# Altium PCB DB42.PcbDoc (part 8 of 8)
Units mil, origin at the board's own origin, x right, y up, seen from the top; angles counter-clockwise.
Board outline 3236.22 x 4456.69 mil, 8 copper layers (Top Layer, MidLayer1, MidLayer2, GND-Layer5, MidLayer3, VCC, MidLayer4, Bottom Layer), stack 62.194 mil thick; 214 components, 470 nets, 1802 pads, 1663 vias.
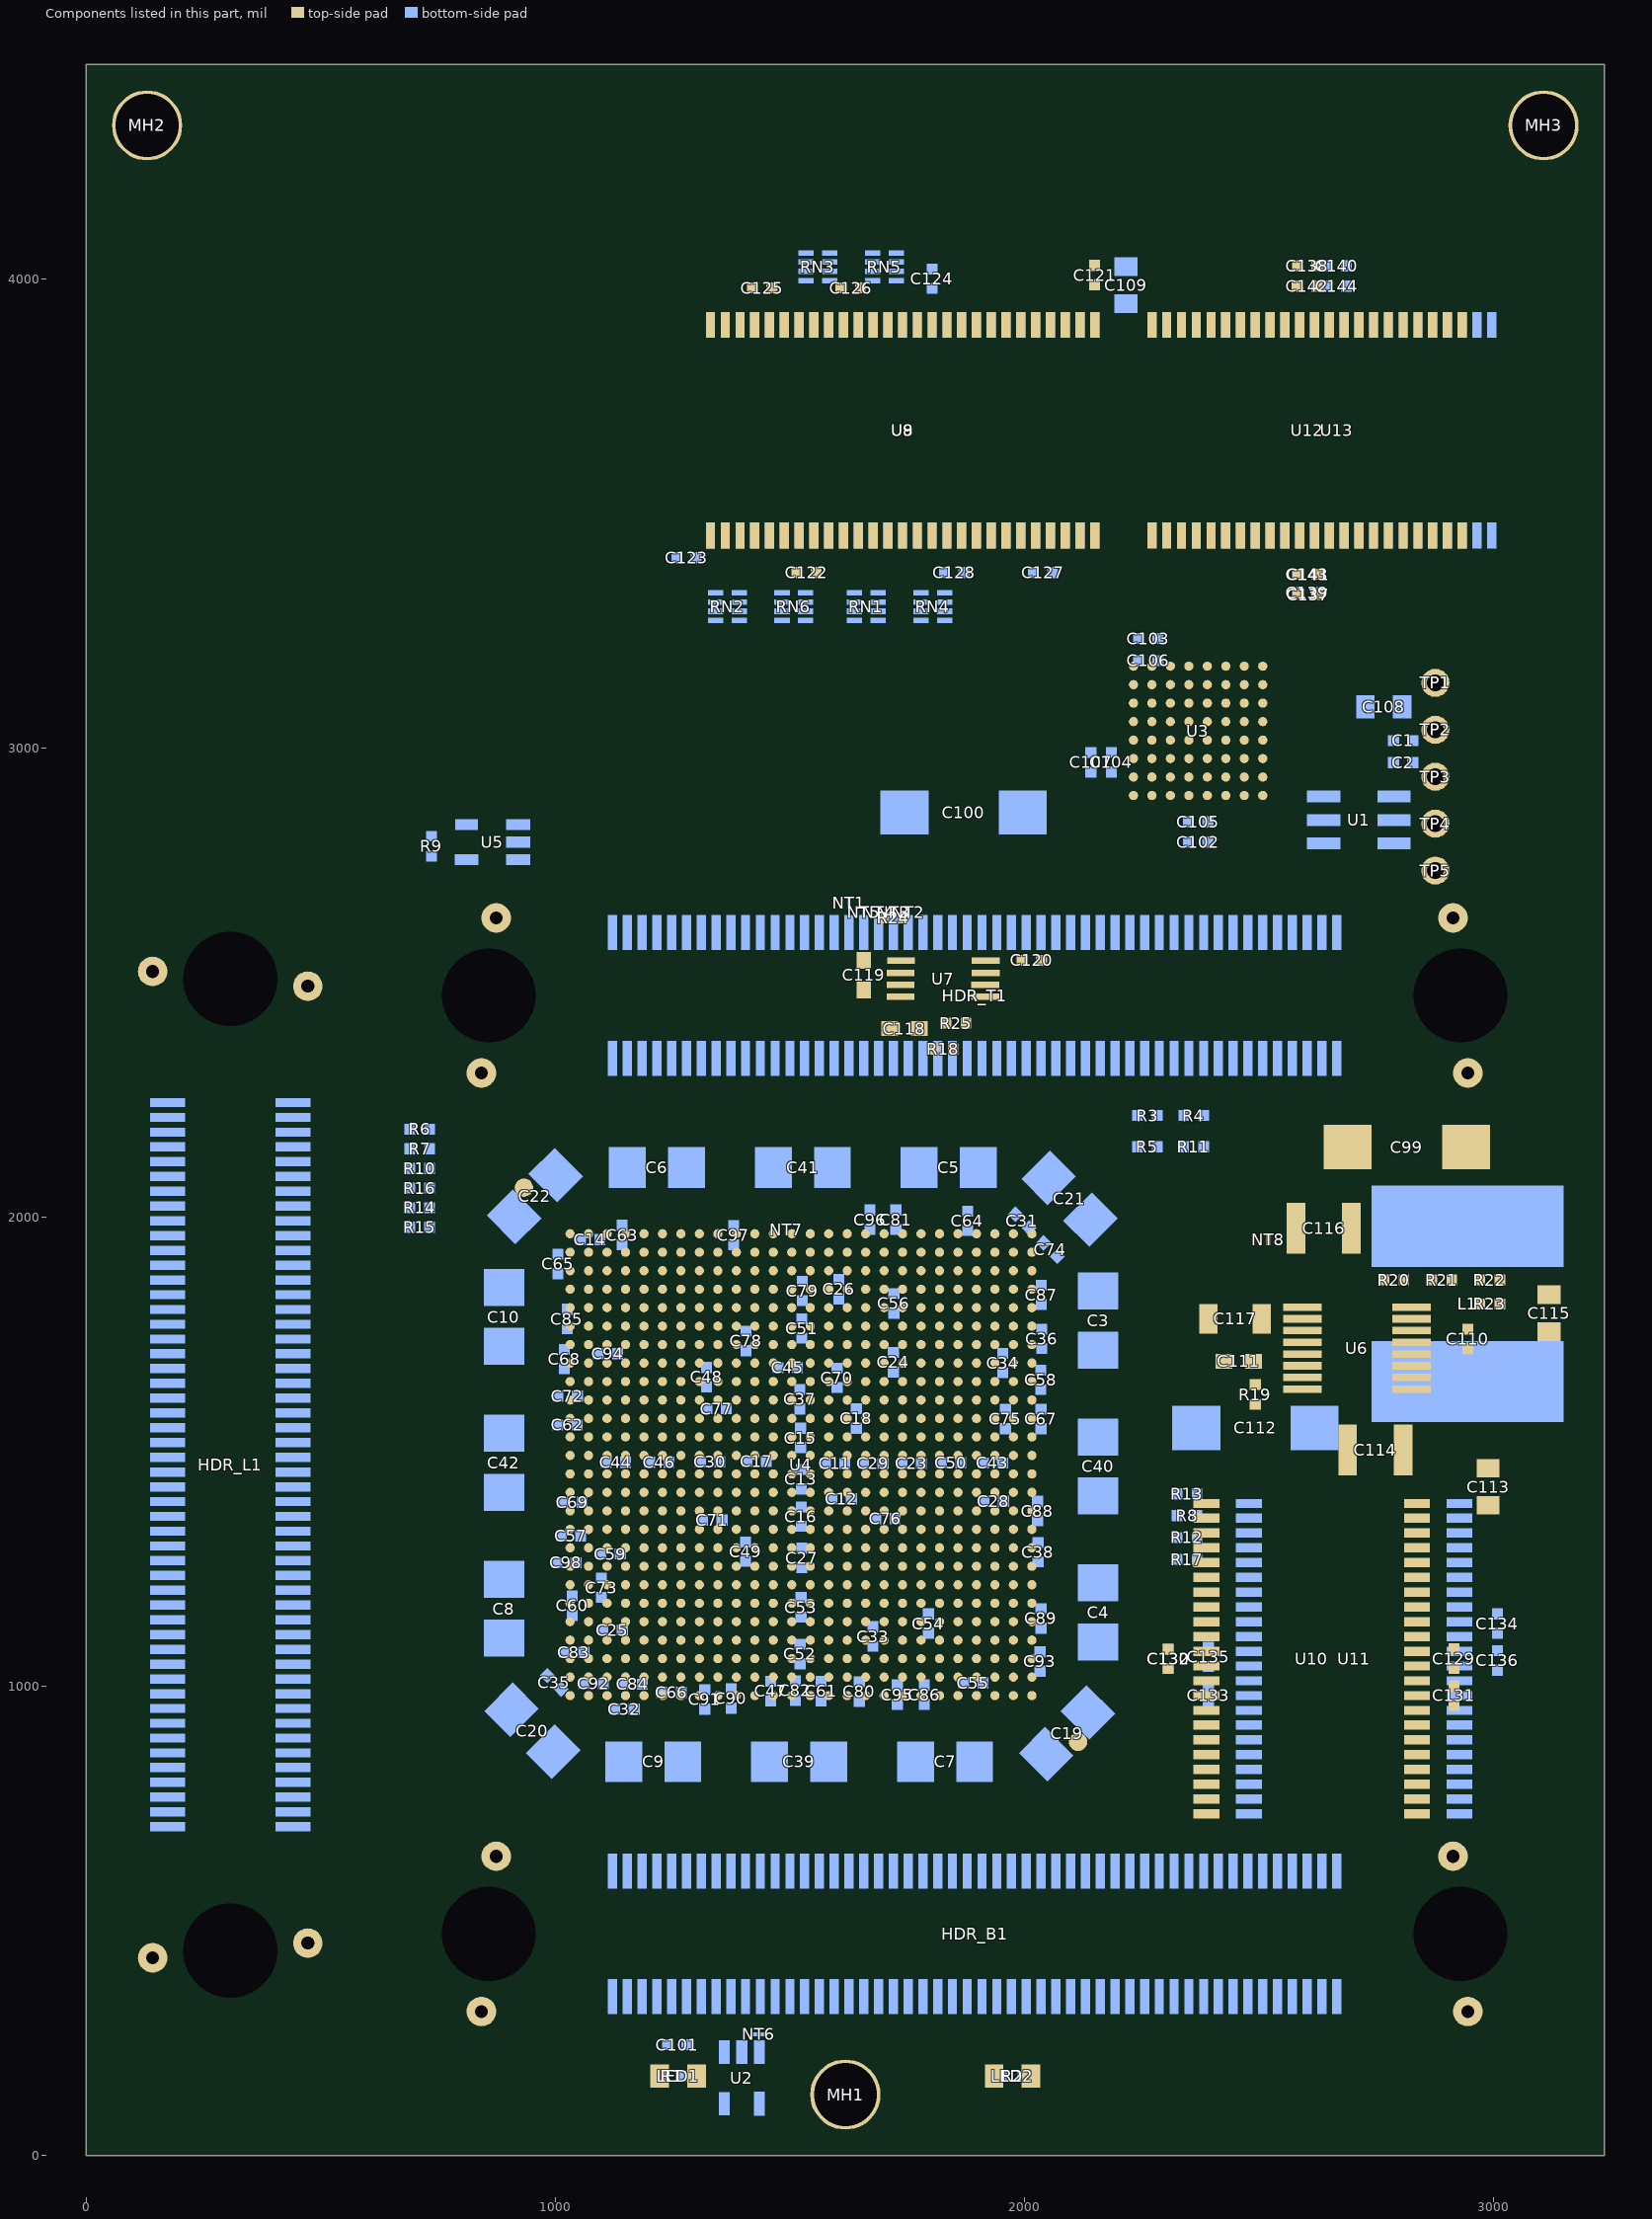
[diagram p14: the components of this part, seen from the top]

## Other copper (continued)
Bottom Layer:
  rectangle net 1V2: 2641.13,1901.74 2787.4,2043.82
  rectangle net LX: 2637.8,1618.11 2799.21,1728.35
  rectangle net 5V0: 2629.92,2248.03 2740.16,2346.46
  rectangle net 5V0: 2645.67,2248.03 2740.16,2346.46
  rectangle net 3V3: 2562.99,2570.86 2610.24,2704.72
  rectangle net 3V3: 2562.99,570.86 2610.24,704.72
  rectangle net GND: 2645.67,2598.43 2740.16,2696.85
  rectangle net 5V0: 2645.67,251.97 2740.16,346.46
  rectangle net GND: 2645.67,598.43 2740.16,696.85
GND-Layer5 (plane layer: these items are gaps in the copper):
  rectangle: 2645.67,2251.97 2740.16,2283.46
  rectangle: 2708.66,2283.47 2740.16,2346.46
  rectangle: 2570.87,2661.42 2602.36,2724.41
  rectangle: 2661.42,1641.73 2720.47,1696.85
  rectangle: 2645.67,251.97 2708.66,283.46
  rectangle: 2708.66,314.96 2740.16,346.46
  rectangle: 2570.87,661.42 2602.36,724.41
  text "GND" at 1645.67,437.01 h60
VCC (plane layer: these items are gaps in the copper):
  rectangle: 3102.36,4334.65 3228.35,4444.88
  rectangle: 23.62,4330.71 129.92,4440.94
  lines w19.68: 2624.02,0 2624.02,356.3 2787.4,519.68 2787.4,637.8 2838.58,688.98 2952.76,688.98 3055.12,791.34 3055.12,1244.09 3055.12,1287.4 3055.12,1389.76 3009.88,1435 2740,1435 2735,1440 2735,1587.6 2716.3,1606.3 2614.17,1606.3 2582.68,1574.8 2452.76,1574.8 2437.01,1590.55 2437.01,2015.75 2624.02,2202.76 2624.02,2383.86 2629.92,2389.76 2795.28,2389.76 2917.32,2267.72 3068.72,2267.72 3116,2315 3116,3975 3046,4045 2728,4045 2711.76,4061.24 2711.76,4456.69
  lines w30: 25.58,627.79 25.58,36.41 36.41,25.58 3205.87,25.58 3210.79,30.5 3210.79,4423.08 3201.94,4431.94 3124.2,4431.94 3123.22,4432.92 38.38,4432.92 27.55,4422.1 27.55,628.78
  text "5V0" at 2791.34,1826.77 h60
  text "3V3" at 1657.48,437.01 h60

## Silkscreen, mask and mechanical layers (free items; w line width, h text height)
Top Overlay:
  rectangle: 998.77,581.74 1627.79,617.74
  rectangle: 998.77,318.48 1627.79,354.48
  rectangle: 2710.5,318.48 2788.79,617.48
  region: 1073.79,617.74 998.77,617.74 998.77,318.48 1073.79,318.48
  region: 1689.96,4181.1 1689.96,4456.69 1670.28,4456.69 1670.28,4181.1
  region: 1598.43,4181.1 1598.43,4456.69 1593.51,4456.69 1593.51,4181.1
  region: 1618.11,4181.1 1618.11,4456.69 1610.24,4456.69 1610.24,4181.1
  region: 1640.75,4181.1 1640.75,4456.69 1628.94,4456.69 1628.94,4181.1
  region: 1664.37,4181.1 1664.37,4456.69 1649.61,4456.69 1649.61,4181.1
  region: 1579.72,4181.1 1579.72,4456.69 1576.77,4456.69 1576.77,4181.1
  rectangle: 1301.18,3503.94 2179.13,3596.46
  rectangle: 2238.19,3502.95 2966.89,3595.47
  region: 2787.4,695.23 2787.4,1424.21 2694.88,1424.21 2694.88,695.23
  rectangle: 1775.59,2456.69 1803,2559.05
  rectangle: 1337.26,129.92 1351.38,208.66
  rectangle: 2049.67,129.92 2063.98,208.66
  rectangle: 2736.22,1620.75 2768.58,1820.75
  region: 1840.85,253.71 1833.78,260.78 1756,183 1763.07,175.93
  rectangle: 1756,183 1766,218
  region: 1772.38,166.61 1779.46,159.54 1857.24,237.33 1850.17,244.4
  region: 1814.46,159.54 1814.46,169.54 1779.46,169.54 1779.46,159.54
  region: 3099.71,4136.09 3089.71,4136.09 3089.71,4026.09 3099.71,4026.09
  region: 3064.97,4111.34 3072.04,4104.27 3096.79,4129.02 3089.71,4136.09
  rectangle: 3112.89,4026.09 3122.89,4136.09
  region: 3122.89,4136.09 3115.82,4129.02 3140.56,4104.27 3147.64,4111.34
  region: 123.34,4136.09 113.34,4136.09 113.34,4026.09 123.34,4026.09
  region: 88.59,4111.34 95.66,4104.27 120.41,4129.02 113.34,4136.09
  rectangle: 136.51,4026.09 146.51,4136.09
  region: 146.51,4136.09 139.44,4129.02 164.19,4104.27 171.26,4111.34
  lines w3: 1118.09,192.91 1133.09,202.91 1123.09,202.91 1143.09,217.91 ; 1133.09,207.91 1143.09,217.91 ; 1133.09,212.91 1143.09,217.91 ; 2137.52,187.01 2152.52,197.01 2142.52,197.01 2162.52,212.01 ; 2152.52,202.01 2162.52,212.01 ; 2152.52,207.01 2162.52,212.01
  lines w5: 971.79,2024.27 992.13,2003.94 ; 1078.13,171.78 1103.06,171.78 ; 1103.06,173.36 1126.68,173.36 ; 1104.64,163.12 1126.68,172.05 ; 1104.64,180.97 1126.68,172.05 ; 1105.03,168.63 1126.68,172.96 ; 1105.03,175.46 1126.68,171.13 ; 1126.68,156.3 1126.68,187.79 ; 1126.68,171.78 1150.04,171.78 ; 1329.1,3386.03 1329.1,3414.79 ; 1687.62,2591.03 1707.96,2570.7 ; 2097.56,165.88 2122.48,165.88 ; 2122.48,167.45 2146.1,167.45 ; 2124.06,157.21 2146.1,166.14 ; 2124.06,175.07 2146.1,166.14 ; 2124.45,162.73 2146.1,167.06 ; 2124.45,169.56 2146.1,165.23 ; 2146.1,150.39 2146.1,181.89 ; 2146.1,165.88 2169.46,165.88 ; 2271.78,3384.98 2271.78,3413.74 ; 2646.32,3273.29 2625.98,3252.95 ; 2907.18,728.42 2878.41,728.42 ; 2908.93,1634.16 2880.16,1634.16 ; 3031.5,1822.83 3073.01,1882.13 ; 992.13,2003.94 964.13,2016.94 971.68,2024.38 979.13,2031.94 992.13,2003.94 ; 1126.68,172.05 1103.06,187.79 1103.06,156.3 1126.68,172.05 ; 1329.1,3414.79 1318.5,3385.8 1329.1,3385.88 1339.71,3385.8 1329.1,3414.79 ; 1707.96,2570.7 1694.96,2598.69 1687.52,2591.14 1679.96,2583.69 1707.96,2570.7 ; 2146.1,166.14 2122.48,150.39 2122.48,181.89 2146.1,166.14 ; 2271.78,3413.74 2282.39,3384.75 2271.78,3384.83 2261.17,3384.75 2271.78,3413.74 ; 2625.98,3252.95 2638.98,3280.95 2646.43,3273.4 2653.98,3265.95 2625.98,3252.95 ; 2878.41,728.42 2907.4,717.82 2907.33,728.42 2907.4,739.03 2878.41,728.42 ; 2880.16,1634.16 2909.15,1623.56 2909.08,1634.16 2909.15,1644.77 2880.16,1634.16
  lines w7: 971.13,2018.93 978.13,2011.94 ; 977.13,2024.94 984.13,2017.94 ; 1324.86,3389.33 1324.86,3399.23 ; 1333.35,3389.33 1333.35,3399.23 ; 1686.96,2585.69 1693.96,2578.69 ; 1692.96,2591.69 1699.96,2584.69 ; 2267.54,3388.29 2267.54,3398.18 ; 2276.02,3388.29 2276.02,3398.18 ; 2633.98,3266.95 2640.98,3273.95 ; 2639.98,3260.95 2646.98,3267.95 ; 2893.97,724.18 2903.87,724.18 ; 2893.97,732.67 2903.87,732.67 ; 2895.72,1629.92 2905.62,1629.92 ; 2895.72,1638.41 2905.62,1638.41
  lines w7.87: 1301.18,3722.33 ccw(c1301.18,3752.07) 1301.18,3781.82 ; 2179.13,3722.33 cw(c2179.13,3752.07) 2179.13,3781.82 ; 1708.66,4185.04 1708.66,4452.76 2972.66,4452.76 2972.66,4185.04 1708.66,4185.04
  text "Xilinx®  Spartan™3A-DSP" at 1708.66,4311.02 h98.43
  text "XC3SD1800A-4FGG676C" at 1708.66,4185.04 h98.43
  text "SRAM-256Kx16" at 2352.07,3683.79 h50
  text "DRAM-16Mx16" at 1482.53,3682.61 h50
  text "FLASH" at 2491.1,2767.2 h34
  text "MAX" at 1831.9,2475.9 h22 r90
  text "8860" at 1865.1,2465.2 h25 r90
  text "1831" at 2721.4,1671.7 h40 r90
  text "SRAM-256Kx16" at 2605.68,808.76 h50 r90
  text "DB42.02" at 1027.8,488.46 h98.42
  text "XC3SD1800A-4FGG676C" at 1027.8,430.47 h60
  text "Xilinx Daughter Board" at 1028.31,354.49 h60
  text "DB42.02" at 1625.79,318.46 h60
  text "PROGRAM" at 1145,60 h55.12
  text "POWER" at 1895,60 h55.12
Bottom Overlay:
  drawing of 1137 lines, arcs and shapes, not listed
  text "Xilinx®  Spartan™3A-DSP" at 2968.73,4318.9 h98.43
  text "XC3SD1800A-4FGG676C" at 2968.73,4185.04 h98.43
  text "MANUFACTURE" at 1006.78,3830.86 h40
  text "DATE" at 1007.88,3764.06 h40
  text "SRAM-256Kx16" at 2939.9,3684 h50
  text "DRAM-16Mx16" at 1997.78,3682.61 h50
  text ".Application_BuildNumber" at 627.63,3398.29 h60
  text "BUILD No:" at 901.4,3398.07 h34
  text "SVN 9250" at 627.63,3338.95 h60
  text "REVISION No:" at 976.18,3338.74 h34
  text "PCB MANUFACTURER:" at 1185.04,3279.53 h34
  text "COMPLIANCE:" at 1182.36,3081.45 h45
  text "CLASS 2" at 432.36,2991.45 h40
  text "IPC-A-600H" at 1092.36,2991.45 h40
  text "CLASS 2" at 432.36,2911.45 h40
  text "TYPE 3" at 682.36,2911.45 h40
  text "IPC-6012D" at 1092.36,2911.45 h40
  text "DS2406" at 2711.2,2774.8 h28 r270
  text "1" at 116.93,2272.44 h39.37
  text "1" at 1085.43,2256.69 h39.37
  text "SRAM-256Kx16" at 2709.68,784.5 h50 r270
  text "1" at 1073.62,264.57 h39.37
  text "DB42" at 412.16,123.67 h120
Bottom Paste:
  rectangle: 2313.39,1935.83 2443.7,2027.16
PCB Boundary:
  lines w3.94: 1523.62,4456.69 3236.22,4456.69 ; 1523.62,4456.69 3236.22,4456.69 ; 1523.62,4456.69 0,4456.69 0,0 1618.11,0 3236.22,0 3236.22,4456.69 ; 1523.62,4456.69 3236.22,4456.69 ; 1523.62,4456.69 3236.22,4456.69
Mechanical 7:
  lines w7.87: 2448.19,1719.13 2271.61,1846.46 2271.61,2043.31 2448.19,2170.63 ; 2511.22,1754.56 2334.65,1881.89 2334.65,2078.74 2511.22,2206.07 ; 2602.32,1944.88 2681.06,1944.88 ; 2641.69,1905.51 2641.69,1984.25 ; 2661.42,1980.32 2740.16,1980.32 ; 2700.79,1940.94 2700.79,2019.69 ; 2831.26,1719.13 3007.83,1846.46 3007.83,2043.31 2831.26,2170.63 ; 2894.29,1754.56 3070.87,1881.89 3070.87,2078.74 2894.29,2206.07
Keep Away From Edge:
  lines w7.87: 200,200 3030,200 3030,4250 200,4250 200,200

## Dimensions
307.09,437.01 to 858.27,472.44 on Dimensions
2929.13,472.44 to 2929.13,2472.44 on Dimensions
3106.3,4326.77 to 3236.22,0 on Dimensions
129.92,4342.52 to 0,15.75 on Dimensions
307.09,-15.75 to 0,4275.59 on Dimensions
3236.22,0 to 0,4059.06 on Dimensions
0,4456.69 to -19.69,0 on Dimensions
2929.14,472.44 to 3236.22,-3.94 on Dimensions
1618.11,153.54 to 3236.22,19.69 on Dimensions
307.09,437.01 to -19.69,0 on Dimensions
1618.11,129.92 to 3244.09,0 on Dimensions
2929.14,472.44 to 3244.09,0 on Dimensions
2865.92,4456.69 to 3106.3,4326.77 on Dimensions

## Text inside footprints (layer, text, board x,y; h text height)
PBFREE: Bottom Overlay "Pb" at 377.32,3566.89 h120
PCB1: Top Overlay "D-810-0025" at 55,-80 h35